# Altium PCB John_Wollam_V2.0.PcbDoc (part 1 of 2)
Units mil, origin at the board's own origin, x right, y up, seen from the top; angles counter-clockwise.
Board outline 3783 x 2360 mil, 2 copper layers (Top Layer, Bottom Layer); 68 components, 42 nets, 236 pads, 62 vias.
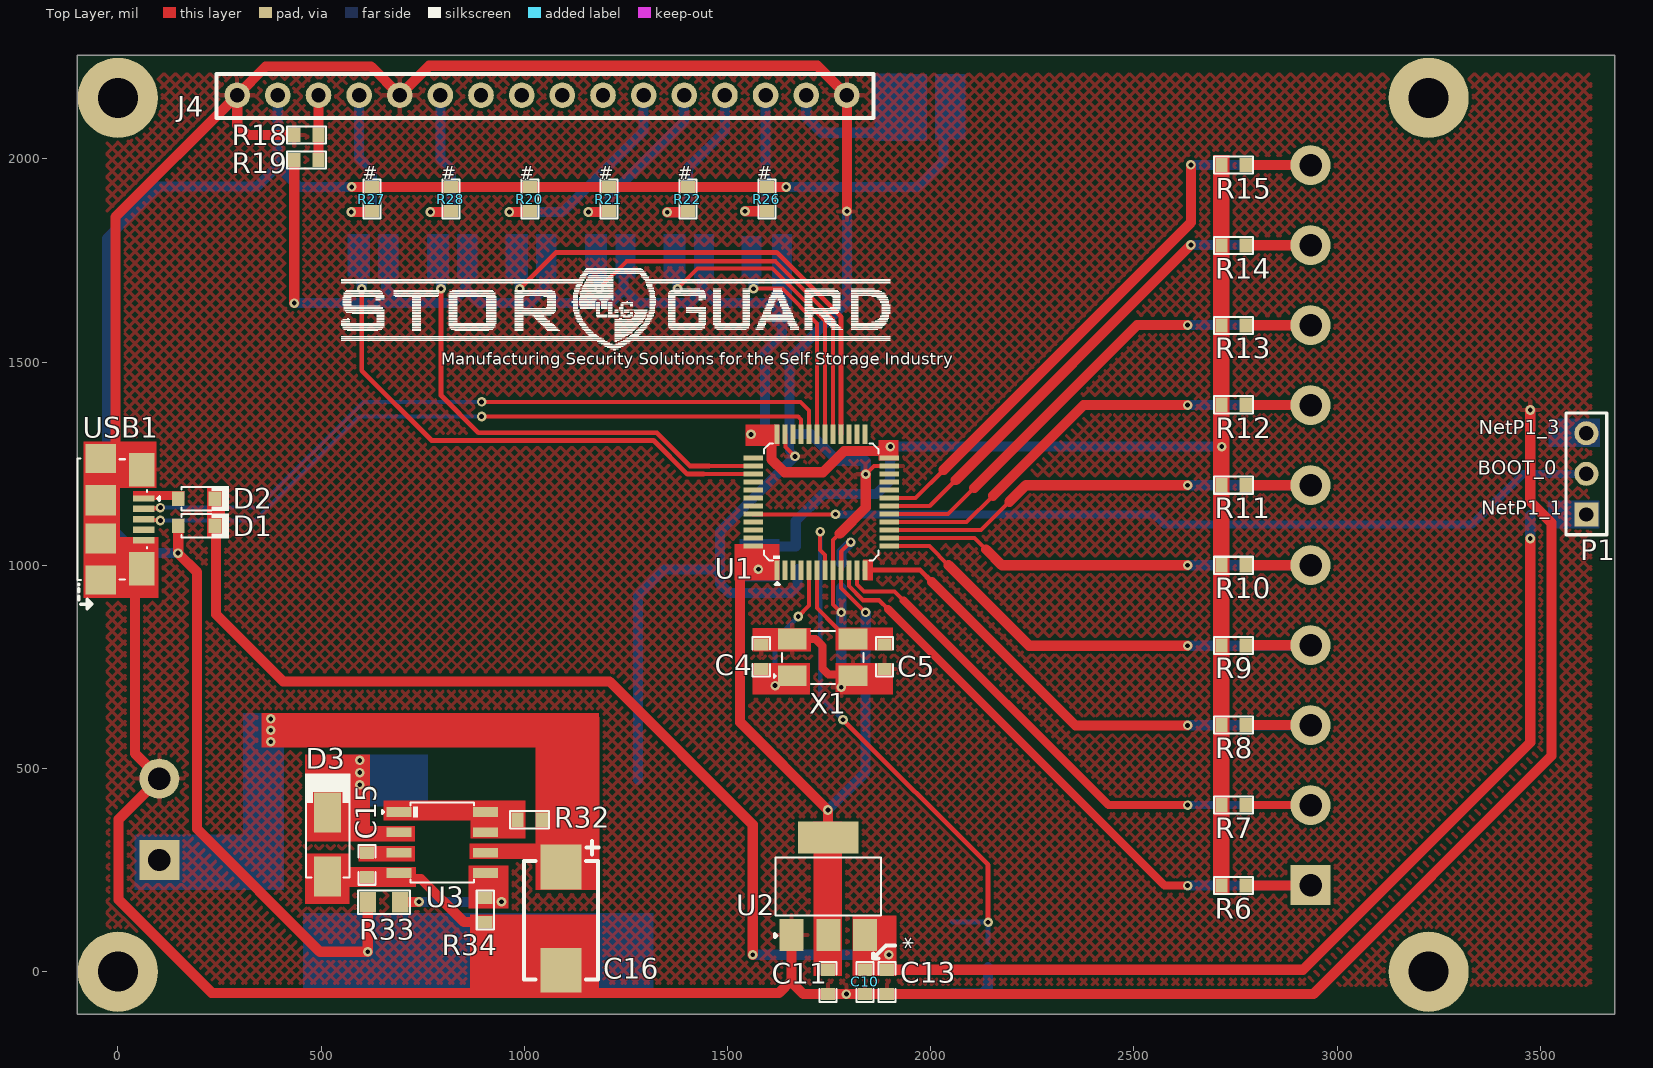
[diagram p0: Top Layer view]
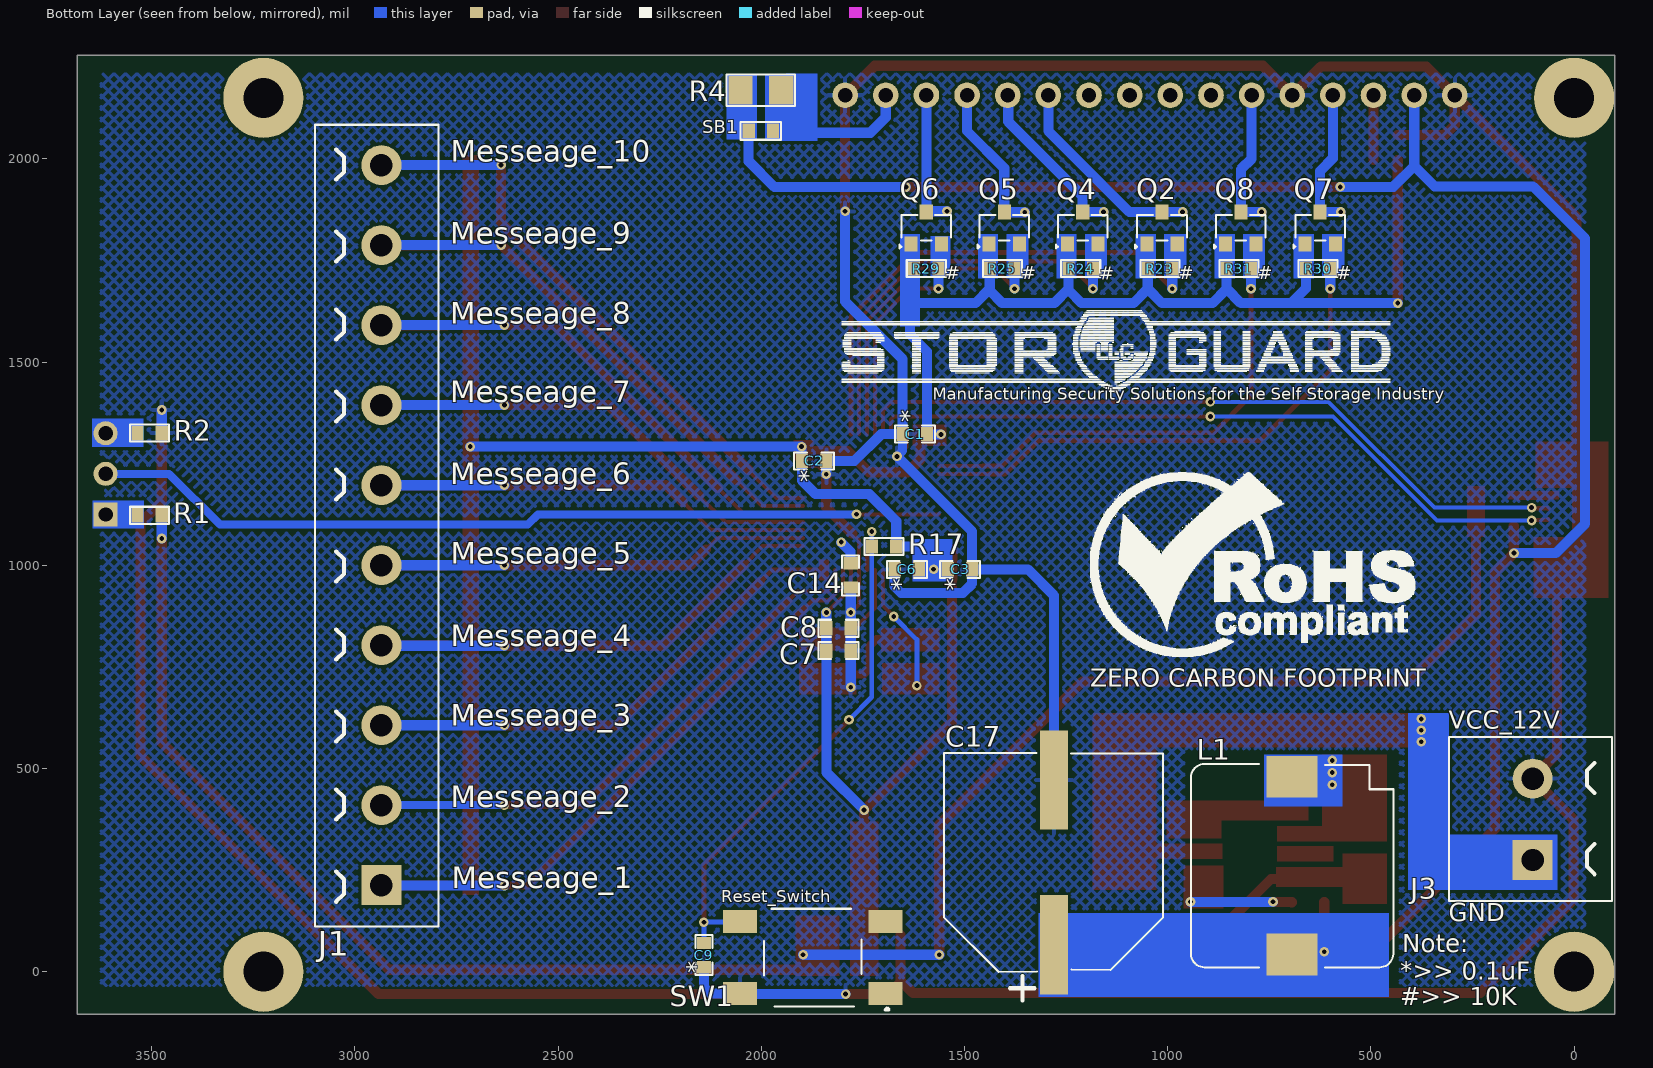
[diagram p1: Bottom Layer view, seen from below]
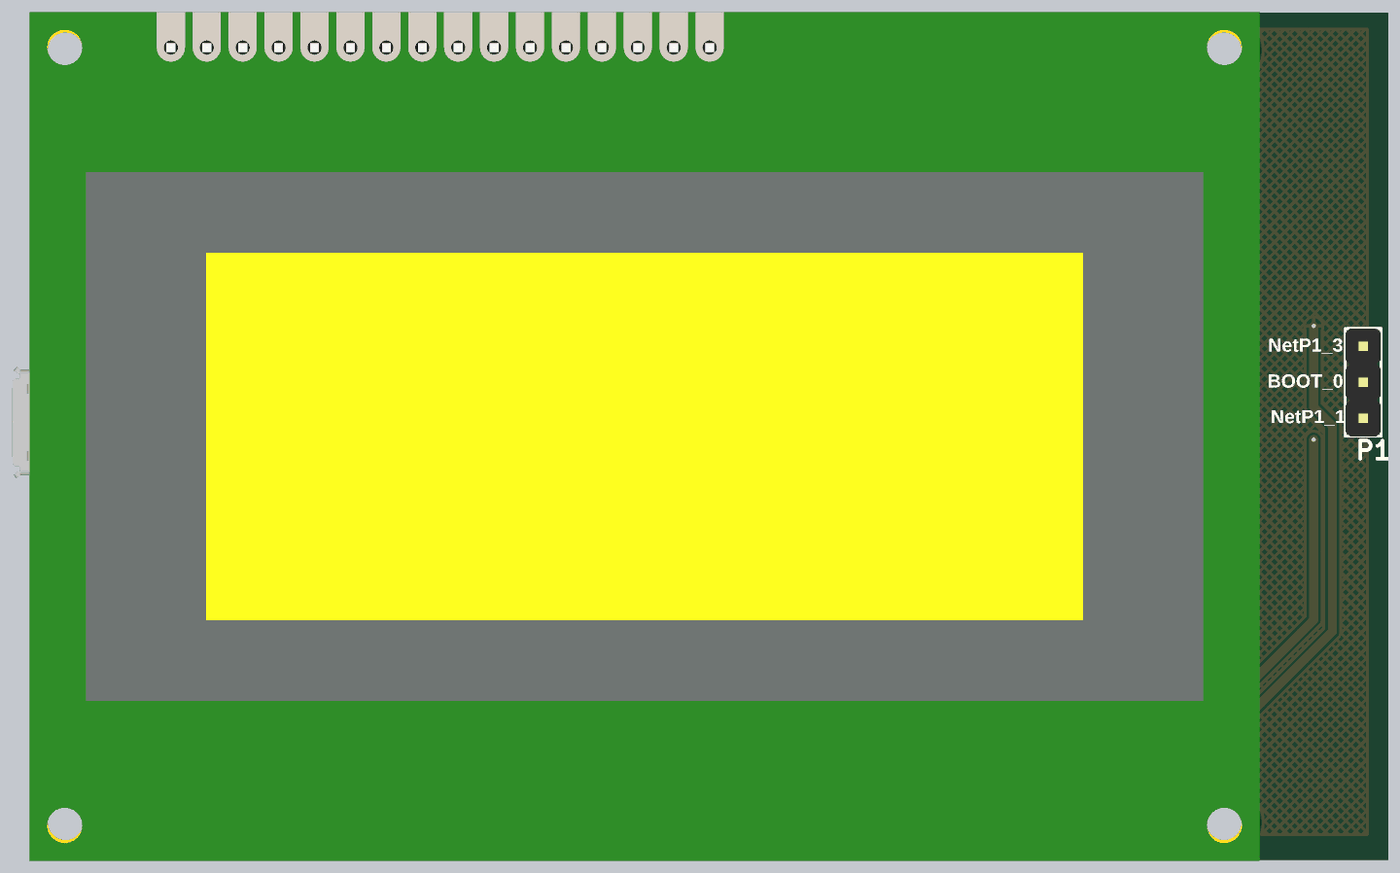
[diagram p2: 3D render of the assembled board from above, using the file's embedded part models]
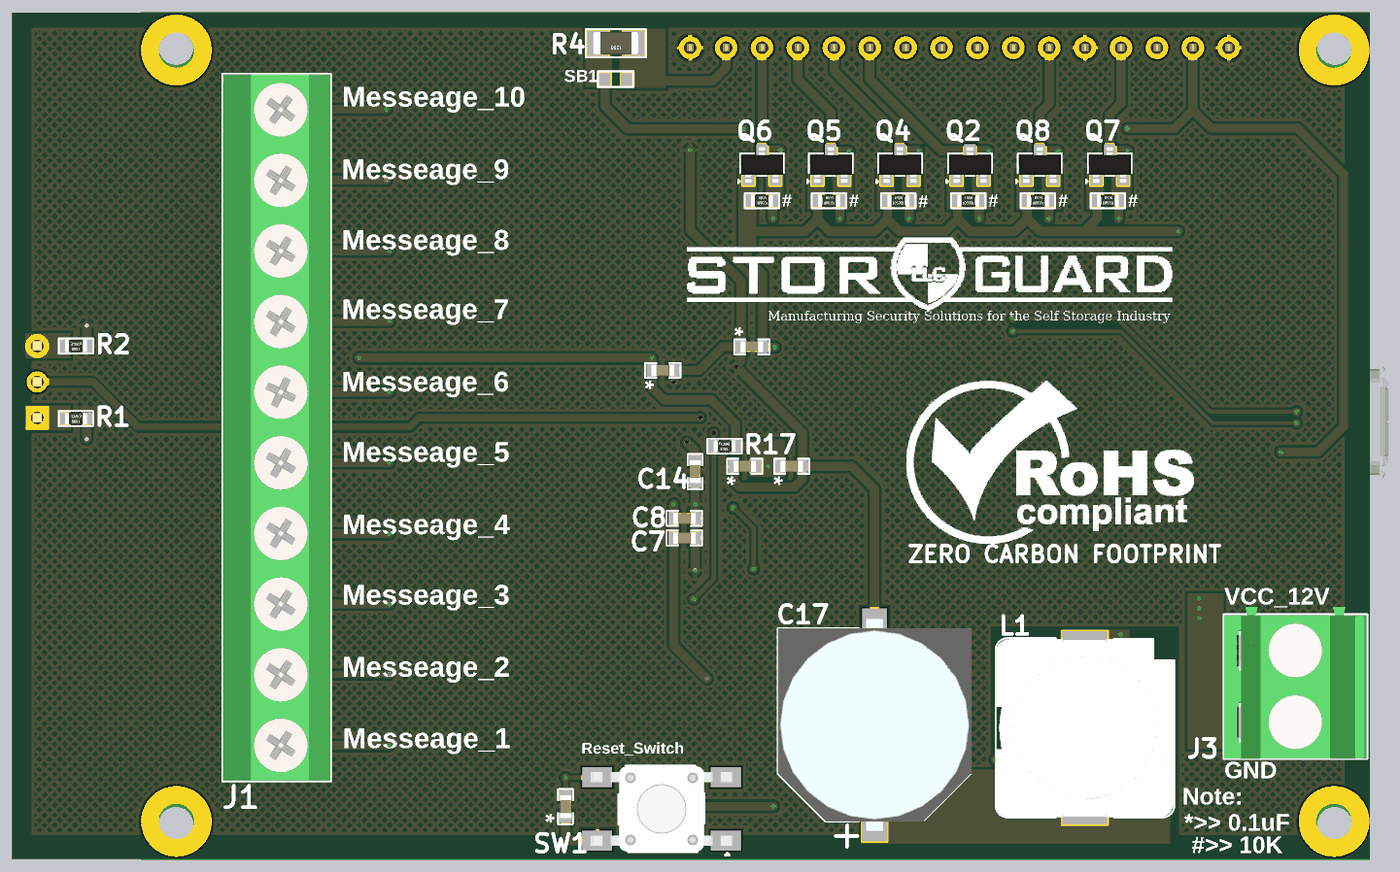
[diagram p3: 3D render of the assembled board from below, using the file's embedded part models]

## Layer stack, top to bottom
Top Solder: solder mask 0.4, Solder Resist, Dk 3.5
Top Layer: signal copper 1.4
Dielectric 1: dielectric 12.6, FR-4, Dk 4.8
Bottom Layer: signal copper 1.4
Bottom Solder: solder mask 0.4, Solder Resist, Dk 3.5

## Board outline
-100,-105 -100,738.49 -100,1049.51 -100,2255 3683,2255 3683,-105

## Design rules (kind name [scope] priority, off if disabled: settings)
Clearance [All] p1: gap=7 ignorepadtopadclearanceinfootprint=FALSE except(5: Arc-SMDPad Track-SMDPad SMDPad-SMDPad)
ComponentClearance [All] p1: gap=0 collisioncheckmode=3 verticalgap=0 showdistances=FALSE
HoleToHoleClearance [All] p1: gap=0 allowstackedmicrovias=TRUE
MinimumSolderMaskSliver [All] p1: minsoldermaskwidth=0
PolygonConnect [All] p1: connectstyle=Relief reliefconductorwidth=10 reliefentries=4 polygonreliefangle="90 Angle" airgapwidth=10
RoutingVias [All] p1: holewidth=11.81 width=23.62 viastyle="Through Hole" minholewidth=11.81 minwidth=23.62 maxholewidth=31.5 maxwidth=62.99
SilkToSilkClearance [All] p1: silktosilkclearance=0
SilkToSolderMaskClearance [IsPad] p1: minsilkscreentomaskgap=0 clearancetoexposedcopper=TRUE
SolderMaskExpansion [All] p1: expansion=4 istentingtop=FALSE
Width [All] p1: maxlimit=50 minlimit=8 preferedwidth=15 minimp=50.000000 maximp=50.000000 favimp=50.000000
25 further rules are at their usual default settings.

## Classes and differential pairs
component class U_Power_Section: C10 C11 C13 C15 C16 C17 D1 D2 D3 L1 R4 R32 R33 R34 SB1 U2 U3
component class U_Logiclevel_Converter_Section: Q2 Q4 Q5 Q6 Q7 Q8 R20 R21 R22 R23 R24 R25 R26 R27 R28 R29 R30 R31
component class U_Controller_Section: C1 C2 C3 C4 C5 C6 C7 C8 C9 C14 P1 R1 R2 R17 SW1 U1 X1
component class U_Connector_Section: J1 J3 J4 R6 R7 R8 R9 R10 R11 R12 R13 R14 R15 R18 R19 SS USB1

## Components (designator, comment, footprint, x,y, rotation, side; value= is the part's Value field where it differs from the comment)
C1 "0.1uF" Cap-0603 1622.09,1322.79 r0 bottom locked
C2 "0.1uF" Cap-0603 1870,1257 r180 bottom locked
C3 "0.1uF" Cap-0603 1511,990.12 r180 bottom locked
C4 "20pF" Cap-0603 1583,775 r270 top locked
C5 "20pF" Cap-0603 1886,775 r90 top locked
C6 "0.1uF" Cap-0603 1641.77,990.12 r0 bottom locked
C7 "1uF" Cap-0603 1810,790 r180 bottom locked
C8 "10000pF" Cap-0603 1810,845 r180 bottom locked
C9 "0.1uF" Cap-0603 2141,41 r90 bottom locked
C10 "0.1uF" Cap-0603 1838,-25 r270 top locked
C11 "4.7uF" Cap-0603 1747,-25 r270 top locked
C13 "1uF" Cap-0603 1892,-25 r270 top locked
C14 "4.7uF" Cap-0603 1780,975 r270 bottom locked
C15 "470pF" Cap-0603 613,263 r90 top locked
C16 "100uF" Case-E 1090.1,257.64 r270 top locked
C17 "470uF" VT1H471MI135000CE0 1280,269 r90 bottom locked
D1 "1N4148WS-7-F" SOD-323 194,1097 r180 top locked
D2 "1N4148WS-7-F" SOD-323 194,1164 r180 top locked
D3 "SS24A" SMA 516,313 r270 top locked
J1 "JL301-50010U02" JL301-50010U02 2934.5,212.85 r90 bottom locked
J3 "WJ500V-5.08-2P" "TERMINAL BLOCK 2P_" 102,375 r90 bottom locked
J4 "16 Pin Female Header With LCD Step" PPPC161LFBN-RC_ 1043.6,2156.5 r0 top locked
L1 "220uH" SLF12575T-221M1R3-PF 694,261 r270 bottom locked
P1 "61300311121" HDR1X3_ 3613,1125 r90 top locked
Q2 "BSS138LT1G" SOT-23 1014,1830 r180 bottom locked
Q4 "BSS138LT1G" SOT-23 1209,1830 r180 bottom locked
Q5 "BSS138LT1G" SOT-23 1402,1830 r180 bottom locked
Q6 "BSS138LT1G" SOT-23 1594,1830 r180 bottom locked
Q7 "BSS138LT1G" SOT-23 625,1830 r180 bottom locked
Q8 "BSS138LT1G" SOT-23 820,1830 r180 bottom locked
R1 "50K" Res-0603 3505,1123 r180 bottom locked
R2 "50K" Res-0603 3505,1325 r180 bottom locked
R4 "3.6R" Res-1206 2001,2169 r0 bottom locked
R6 "20K" Res-0603 2745,212 r180 top locked
R7 "20K" Res-0603 2745,410 r180 top locked
R8 "20K" Res-0603 2745,607 r180 top locked
R9 "20K" Res-0603 2745,803 r180 top locked
R10 "20K" Res-0603 2745,1000 r180 top locked
R11 "20K" Res-0603 2745,1197 r180 top locked
R12 "20K" Res-0603 2745,1395 r180 top locked
R13 "20K" Res-0603 2745,1590 r180 top locked
R14 "20K" Res-0603 2745,1787 r180 top locked
R15 "20K" Res-0603 2745,1985 r180 top locked
R17 "20K" Res-0603 1698,1046 r180 bottom locked
R18 "1K" Res-0603 464,2059 r0 top locked
R19 "DNP" Res-0603 464,1997 r180 top locked value=56K
R20 "10K" Res-0603 1013.8,1901 r90 top locked
R21 "10K" Res-0603 1208.2,1901 r90 top locked
R22 "10K" Res-0603 1402.6,1901 r90 top locked
R23 "10K" Res-0603 1019,1730 r0 bottom locked
R24 "10K" Res-0603 1214,1730 r0 bottom locked
R25 "10K" Res-0603 1407,1730 r0 bottom locked
R26 "10K" Res-0603 1597,1901 r90 top locked
R27 "10K" Res-0603 625,1901 r90 top locked
R28 "10K" Res-0603 819.4,1901 r90 top locked
R29 "10K" Res-0603 1594,1730 r0 bottom locked
R30 "10K" Res-0603 630,1730 r0 bottom locked
R31 "10K" Res-0603 825,1730 r0 bottom locked
R32 "0.33R" Res-0603 1013,374 r0 top locked value=0.33Ω
R33 "3.75K" RES-0805 655,171 r180 top locked
R34 "1.2K" Res-0603 904,152 r270 top locked value=1.2kΩ
SB1 "Solder Bridge" "Solder Bridge" 2001,2069 r180 bottom locked
SW1 "Tactile Switch" TL3301NF160QG 1873.44,35 r0 bottom locked value=Custom
U1 "STM32F070CBT6TR" "48-LQFP (7x7)_" 1730.35,1155.47 r90 top locked
U2 "LDL1117S33R" "SOT- 223" 1748,210 r0 top locked
U3 "MC34063ADR" SOIC-8 798,318 r0 top locked
USB1 "10118192-0001LF" 10118192-0001LF_ 10.66,1113.24 r90 top locked
X1 "8MHz" 5TJ480000XYLBC_ 1734,773.5 r0 top locked

## Footprints (in the part's own frame and the unit in brackets; to place one, negate y for a bottom-side part, rotate by r counter-clockwise, add the part's x,y. Pads: shape width x height; smd on the part's side, far side on the other; paste and mask are expansions set on the pad)
5TJ480000XYLBC_ [mm]
  rect 1.8x1.3 smd mask+0.07: 1(-1.9,-1.15) 2(1.9,-1.15) 3(1.9,1.15) 4(-1.9,1.15)
  silkscreen extent -3.05,-1.65 2.54,1.65, body extent -2.5,-1.6 2.5,1.6, height 1
"48-LQFP (7x7)_" [mm]
  rect 1.22x0.32 smd: 1(-4.25,2.75) 2(-4.25,2.25) 3(-4.25,1.75) 4(-4.25,1.25) 5(-4.25,0.75) 6(-4.25,0.25) 7(-4.25,-0.25) 8(-4.25,-0.75) 9(-4.25,-1.25) 10(-4.25,-1.75) 11(-4.25,-2.25) 12(-4.25,-2.75) 25(4.25,-2.75) 26(4.25,-2.25) 27(4.25,-1.75) 28(4.25,-1.25) 29(4.25,-0.75) 30(4.25,-0.25) 31(4.25,0.25) 32(4.25,0.75) 33(4.25,1.25) 34(4.25,1.75) 35(4.25,2.25) 36(4.25,2.75)
  rect 0.32x1.22 smd: 13(-2.75,-4.25) 14(-2.25,-4.25) 15(-1.75,-4.25) 16(-1.25,-4.25) 17(-0.75,-4.25) 18(-0.25,-4.25) 19(0.25,-4.25) 20(0.75,-4.25) 21(1.25,-4.25) 22(1.75,-4.25) 23(2.25,-4.25) 24(2.75,-4.25) 37(2.75,4.25) 38(2.25,4.25) 39(1.75,4.25) 40(1.25,4.25) 41(0.75,4.25) 42(0.25,4.25) 43(-0.25,4.25) 44(-0.75,4.25) 45(-1.25,4.25) 46(-1.75,4.25) 47(-2.25,4.25) 48(-2.75,4.25)
  silkscreen extent -5.16,-3.58 3.66,3.58, body extent -4.51,-4.51 4.49,4.49, height 1.43
10118192-0001LF_ [mm] "CONN RCPT USB2.0 MICRO B SMD R/A"
  rect 0.4x1.35 smd: 1(1.3,-1.337) 2(0.65,-1.337) 3(0,-1.337) 4(-0.65,-1.337) 5(-1.3,-1.337)
  rect 2.1x1.6 smd: MP1(3.1,-1.212) MP2(-3.1,-1.212)
  rect 1.8x1.9 smd: MP3(-3.8,1.338) MP6(3.8,1.338)
  rect 1.9x1.9 smd: MP4(-1.2,1.338) MP5(1.2,1.338)
  silkscreen extent -5.61,-2.34 3.8,2.79, body extent -3.95,-1.57 3.96,4.09, height 2.74
Cap-0603 [mil]
  rect 30x35 smd mask+2.36: 1(-30,0) 2(30,0)
  silkscreen extent -49,-21 49,21, body extent -32,-16 31,16, height 34
Case-E [mm]
  rect 2.79x2.57 smd: 1(0,0) 2(6.44,0)
  silkscreen extent -1.63,-2.31 7.03,2.34, body extent -0.27,-2.21 6.92,2.21, height 2.88
HDR1X3_ [mm] "Connector; Header; 3 Position"
  rect 1.5x1.5 hole 0.9: 1(0,0)
  round 1.5 hole 0.9: 2(2.54,0) 3(5.08,0)
  silkscreen extent -1.27,-1.27 6.35,1.27, body extent -1.27,-1.24 6.35,1.25, height 8.54
JL301-50010U02 [mm]
  rect 2.5x2.5 hole 1.397: 1(0,0)
  round 2.5 hole 1.397: 2(5,0) 3(10,0) 4(15,0) 5(20,0) 6(25,0) 7(30,0) 8(35,0) 9(40,0) 10(45,0)
  silkscreen extent -2.57,-3.56 47.52,4.14, body extent -2.52,-3.51 47.48,4.09, height 11.7
PPPC161LFBN-RC_ [mm] "CONN HDR 16POS 0.1 GOLD PCB"
  round 1.6 hole 0.9: 1(-19.05,0) 2(-16.51,0) 3(-13.97,0) 4(-11.43,0) 5(-8.89,0) 6(-6.35,0) 7(-3.81,0) 8(-1.27,0) 9(1.27,0) 10(3.81,0) 11(6.35,0) 12(8.89,0) 13(11.43,0) 14(13.97,0) 15(16.51,0) 16(19.05,0)
  silkscreen extent -20.35,-1.42 20.73,1.32, body extent -29.06,-57.48 57.94,2.52, height 21.8
Res-0603 [mil]
  rect 30x35 smd: 1(-30,0) 2(30,0)
  silkscreen extent -48,-21 48,21, body extent -31,-17 31,17, height 18
RES-0805 [mil] "SMD 0805"
  rect 40x50 smd: 1(-40,0) 2(40,0)
  silkscreen extent -64,-29 64,29, body extent -39,-25 39,24, height 24
Res-1206 [mil]
  rect 60x70 smd: 1(-50,0) 2(50,0)
  silkscreen extent -84,-39 84,39, body extent -63,-31 63,32, height 39
SLF12575T-221M1R3-PF [mm] "0.492\" L x 0.492\" W (12.50mm x 12.50mm)"
  rect 2.6x3.2 smd: 1(-5.55,0) 2(5.55,0)
  silkscreen extent -6.35,-6.32 6.35,6.32, body extent -6.27,-6.33 6.33,6.27, height 7.5
SMA [mm]
  rect 2.5x1.7 smd: 1(-2,0) 2(2,0)
  silkscreen extent -4.45,-1.42 2.06,1.42, body extent -2.6,-1.3 2.6,1.3, height 2.4
SOD-323 [mm]
  rect 0.8x0.9 smd mask+0.055: 1(-1.15,0) 2(1.15,0)
  silkscreen extent -2.01,-0.79 0.94,0.79, body extent -1.3,-0.67 1.3,0.67, height 1.1
SOIC-8 [mm]
  rect 1.55x0.6 smd: 1(-2.7,1.905) 2(-2.7,0.635) 3(-2.7,-0.635) 4(-2.7,-1.905) 5(2.7,-1.905) 6(2.7,-0.635) 7(2.7,0.635) 8(2.7,1.905)
  silkscreen extent -3.76,-2.49 1.99,2.49, body extent -3,-2.45 3,2.45, height 1.7
"Solder Bridge" [mil] "Solder Bridge ON"
  rect 30x35 smd: 1(-30,0) 2(30,0)
  silkscreen extent -50,-22 50,22
SOT-23 [mm] "TRANS NPN 40V 0.6A SOT23"
  rect 0.82x0.92 smd: 1(-0.95,-1) 2(0.95,-1) 3(0,1)
  silkscreen extent -1.68,-1.3 1.55,0.81, body extent -1.5,-1.25 1.5,1.25, height 1.05
"SOT- 223" [mm]
  rect 1.5x2 smd: 1(-2.3,-3.05) 2(0,-3.05) 3(2.3,-3.05)
  rect 3.8x2 smd: 4(0,3.05)
  silkscreen extent -3.35,-3.2 3.3,1.8, body extent -3.25,-3.5 3.25,3.5, height 1.61
"TERMINAL BLOCK 2P_" [mm] "TERMINAL BLOCK 2POS 5.08MM SIDE"
  rect 2.5x2.5 hole 1.4: 1(-2.54,0)
  round 2.5 hole 1.4: 2(2.54,0)
  silkscreen extent -5.1,-4.96 5.14,5.22, body extent -5.08,-4.9 5.68,5.2, height 13.8
TL3301NF160QG [mm]
  rect 2.12x1.42 smd: 1(-4.55,2.25) 2(4.55,2.25) 3(-4.55,-2.25) 4(4.55,-2.25)
  silkscreen extent -4.78,-3.05 3.05,3.28, body extent -5,-3 5,3, height 4.41
VT1H471MI135000CE0 [mm] "470uF ±20% 50V 12.5mm 13.5mm 1000hrs 105? -40?~+105? SMD,12.5x13.5mm Aluminum Electrolytic Capacitors - SMD RoHS"
  rect 6.2x1.75 smd: 1(-5.145,0) 2(5.145,0)
  silkscreen extent -8.62,-6.81 6.83,6.86, body extent -7.5,-6.85 7.5,6.85, height 14

## Part data
C1 C2 C3 C6 C9 C10: library part CC0603ZRY5V9BB104, "CAP CER 0.1UF 50V Y5V 0603", Capacitance=100nF, Case Code (Imperial)=0603, Case Code (Metric)=1608, Dielectric=Y5V, LCSC Part Number=C106221, Manufacturer=Yageo, Max Operating Temperature=85°C, Min Operating Temperature=-30°C, Package Quantity=1, Supplier Part Number 1=311-1343-1-ND, Tolerance=80%, Voltage=50V, Case/Package=0603, ComponentLink1Description=http://www.yageo.com/documents/recent/UPY-GPHC_Y5V_6.3V-to-50V_8.pdf?src-supplier=Digi-Key, ComponentLink1URL=http://www.yageo.com/documents/recent/UPY-GPHC_Y5V_6.3V-to-50V_8.pdf?src-supplier=Digi-Key, ComponentLink2Description=http://www.yageo.com/documents/recent/UPY-GPHC_Y5V_6.3V-to-50V_5.pdf?src-supplier=Avnet+Europe, ComponentLink2URL=http://www.yageo.com/documents/recent/UPY-GPHC_Y5V_6.3V-to-50V_5.pdf?src-supplier=Avnet+Europe, ComponentLink3Description=https://www.verical.com/server-webapp/html/getDatasheet?partID=403611&src-supplier=Verical, ComponentLink3URL=https://www.verical.com/server-webapp/html/getDatasheet?partID=403611&src-supplier=Verical, ComponentLink4Description=http://www.mouser.com/ds/2/447/Yageo_UPY-GP_NP0_16V-to-50V_9-358835.pdf?src-supplier=Mouser, ComponentLink4URL=http://www.mouser.com/ds/2/447/Yageo_UPY-GP_NP0_16V-to-50V_9-358835.pdf?src-supplier=Mouser, ComponentLink5Description=http://www.farnell.com/datasheets/1132289.pdf?src-supplier=Element14, ComponentLink5URL=http://www.farnell.com/datasheets/1132289.pdf?src-supplier=Element14, Composition=Ceramic, Depth=0.8mm, Halogen Free="Halogen Free", Height=0.8mm, Lead Free="Lead Free", Length=1.6mm, Manufacturer Part Number=CC0603ZRY5V9BB104, Mount="Surface Mount", Number of Pins=2, Packaging="Tape and Reel", Pricing 1="1=0.1, 10=0.075, 100=0.0334, 500=0.02386, 1000=0.01874 (USD)", Radiation Hardening=No, REACH SVHC="No SVHC", Stock 1=15000880, Supplier 1=Digi-Key, Termination=SMD/SMT, Thickness=0.035inch, Voltage Rating=50V, Voltage Rating (DC)=50V, Width=0.031inch
C4 C5: library part CC0603JRNPO9BN200, "CAP CER 20PF 50V C0G/NPO 0603", Case Code (Imperial)=0603, Case Code (Metric)=1608, Dielectric=C0G, LCSC Part Number=C105621, Manufacturer=Yageo, Max Operating Temperature=125°C, Min Operating Temperature=-55°C, Package Quantity=4000, Supplier Part Number 1=311-1424-6-ND, Tolerance=5%, Voltage Rating=50V, Capacitance=20pF, Case/Package=0603, ComponentLink1Description=http://www.farnell.com/datasheets/1132289.pdf?src-supplier=Element14, ComponentLink1URL=http://www.farnell.com/datasheets/1132289.pdf?src-supplier=Element14, ComponentLink2Description=http://www.yageo.com/documents/recent/UPY-GP_NP0_16V-to-50V_16.pdf?src-supplier=Digi-Key, ComponentLink2URL=http://www.yageo.com/documents/recent/UPY-GP_NP0_16V-to-50V_16.pdf?src-supplier=Digi-Key, Composition=Ceramic, Depth=0.8mm, Lead Free="Lead Free", Length=1.6mm, Manufacturer Part Number=CC0603JRNPO9BN200, Mount="Surface Mount", Number of Pins=2, Packaging="Tape and Reel", Pricing 1="1=0.1, 10=0.048, 100=0.0214, 500=0.01526, 1000=0.01198 (USD)", REACH SVHC=Unknown, Stock 1=259568, Supplier 1=Digi-Key, Termination=SMD/SMT, Thickness=0.035inch, Voltage Rating (DC)=50V, Weight=7.1E-05oz, Width=0.8mm
C7 C13: library part UMK107AB7105KA-T, "CAP CER 1UF 50V X7R 0603", Case Code (Imperial)=0603, Case Code (Metric)=1608, Dielectric=X7R, LCSC Part Number=C105174, Manufacturer="Taiyo Yuden", Max Operating Temperature=125°C, Min Operating Temperature=-55°C, Package Quantity=1, Supplier Part Number 1=587-3247-1-ND, Tolerance=10%, Voltage Rating=50V, Capacitance=1uF, Case/Package=0603, ComponentLink1Description=http://www.farnell.com/datasheets/2048165.pdf?src-supplier=Element14, ComponentLink1URL=http://www.farnell.com/datasheets/2048165.pdf?src-supplier=Element14, ComponentLink2Description=https://www.murata.com/~/media/webrenewal/support/library/catalog/products/capacitor/mlcc/c02e.ashx?la=en-us&src-supplier=Digi-Key, ComponentLink2URL=https://www.murata.com/~/media/webrenewal/support/library/catalog/products/capacitor/mlcc/c02e.ashx?la=en-us&src-supplier=Digi-Key, ComponentLink3Description=https://www.yuden.co.jp/productdata/catalog/mlcc_all_e.pdf?src-supplier=Digi-Key, ComponentLink3URL=https://www.yuden.co.jp/productdata/catalog/mlcc_all_e.pdf?src-supplier=Digi-Key, ComponentLink4Description=https://www.yuden.co.jp/productdata/catalog/mlcc_all_e.pdf?src-supplier=Onlinecomponents.com, ComponentLink4URL=https://www.yuden.co.jp/productdata/catalog/mlcc_all_e.pdf?src-supplier=Onlinecomponents.com, Depth=0.8mm, Halogen Free="Halogen Free", Height=0.8mm, Length=1.6mm, Manufacturer Part Number=UMK107AB7105KA-T, Mount="Surface Mount", Packaging="Tape and Reel", Pricing 1="1=0.28, 10=0.19, 100=0.1079, 500=0.0762, 1000=0.0667 (USD)", Radiation Hardening=No, Stock 1=453098, Supplier 1=Digi-Key, Termination=SMD/SMT, Thickness=0.037inch, Voltage Rating (DC)=50V, Width=0.031inch
C8: library part CC0603KRX7R9BB103, "CAP CER 10000PF 50V X7R 0603", Capacitance=10nF, Case Code (Imperial)=0603, Case Code (Metric)=1608, Dielectric=X7R, Insulation Resistance=100GR, LCSC Part Number=C100042, Manufacturer=Yageo, Max Operating Temperature=125°C, Min Operating Temperature=-55°C, Package Quantity=1, Supplier Part Number 1=311-1085-6-ND, Tolerance=10%, Voltage=50V, Case/Package=0603, ComponentLink1Description=http://www.farnell.com/datasheets/1734573.pdf?src-supplier=Element14, ComponentLink1URL=http://www.farnell.com/datasheets/1734573.pdf?src-supplier=Element14, ComponentLink2Description=http://www.yageo.com/documents/recent/UPY-GPHC_X7R_6.3V-to-50V_18.pdf?src-supplier=Digi-Key, ComponentLink2URL=http://www.yageo.com/documents/recent/UPY-GPHC_X7R_6.3V-to-50V_18.pdf?src-supplier=Digi-Key, ComponentLink3Description=http://www.farnell.com/datasheets/2167236.pdf?src-supplier=Mouser, ComponentLink3URL=http://www.farnell.com/datasheets/2167236.pdf?src-supplier=Mouser, ComponentLink4Description=http://www.farnell.com/datasheets/70765.pdf?src-supplier=Element14, ComponentLink4URL=http://www.farnell.com/datasheets/70765.pdf?src-supplier=Element14, ComponentLink5Description=http://www.yageo.com/documents/recent/UPY-GPHC_X7R_6.3V-to-50V_8.pdf?src-supplier=Avnet+Europe, ComponentLink5URL=http://www.yageo.com/documents/recent/UPY-GPHC_X7R_6.3V-to-50V_8.pdf?src-supplier=Avnet+Europe, ComponentLink6Description=http://www.farnell.com/datasheets/1489800.pdf?src-supplier=Element14, ComponentLink6URL=http://www.farnell.com/datasheets/1489800.pdf?src-supplier=Element14, ComponentLink7Description=https://www.verical.com/server-webapp/html/getDatasheet?partID=403582&src-supplier=Verical, ComponentLink7URL=https://www.verical.com/server-webapp/html/getDatasheet?partID=403582&src-supplier=Verical, Composition=Ceramic, Depth=0.8mm, Halogen Free="Halogen Free", Height=0.8mm, Lead Free="Lead Free", Length=1.6mm, Manufacturer Part Number=CC0603KRX7R9BB103, Material=Ceramic, Mount="Surface Mount", Number of Pins=2, Packaging="Tape and Reel", Pricing 1="1=0.1, 10=0.038, 100=0.0171, 500=0.01224, 1000=0.00962 (USD)", Radiation Hardening=No, REACH SVHC="No SVHC", Stock 1=8411467, Supplier 1=Digi-Key, Termination=SMD/SMT, Thickness=0.035inch, Voltage Rating=50V, Voltage Rating (DC)=50V, Width=0.031inch
C11 C14: library part GRM188R61E475KE11D, "CAP CER 4.7UF 25V X5R 0603", Case Code (Imperial)=0603, Case Code (Metric)=1608, Dielectric=X5R, LCSC Part Number=C90057, Manufacturer=Murata, Max Operating Temperature=85°C, Min Operating Temperature=-55°C, Package Quantity=4000, Supplier Part Number 1=490-7203-1-ND, Tolerance=10%, Voltage=25V, Capacitance=4.7uF, Case/Package=0603, ComponentLink1Description=http://www.farnell.com/datasheets/2048165.pdf?src-supplier=Element14, ComponentLink1URL=http://www.farnell.com/datasheets/2048165.pdf?src-supplier=Element14, ComponentLink2Description=https://www.murata.com/~/media/webrenewal/support/library/catalog/products/capacitor/mlcc/c02e.ashx?la=en-us&src-supplier=Digi-Key, ComponentLink2URL=https://www.murata.com/~/media/webrenewal/support/library/catalog/products/capacitor/mlcc/c02e.ashx?la=en-us&src-supplier=Digi-Key, Depth=0.8mm, Height=0.8mm, Lead Free="Lead Free", Length=1.6mm, Manufacturer Part Number=GRM188R61E475KE11D, Material=Ceramic, Mount="Surface Mount", Packaging="Cut Tape", Pricing 1="1=0.37, 10=0.258, 100=0.1549, 500=0.1162, 1000=0.09812 (USD)", REACH SVHC="No SVHC", Stock 1=71618, Supplier 1=Digi-Key, Thickness=0.031inch, Voltage Rating=25V, Voltage Rating (DC)=25V, Width=0.031inch
C15: library part CC0603KRX7R9BB471, "CAP CER 470pF 10% X7R 50V 0603 SMD", Case Code (Imperial)=0603, Case Code (Metric)=1608, Dielectric=X7R, Dielectric Material=Ceramic, Insulation Resistance=10GR, LCSC Part Number=C107092, Manufacturer=Yageo, Max Operating Temperature=125°C, Min Operating Temperature=-55°C, Package Quantity=1, Supplier Part Number 1=311-1078-1-ND, Tolerance=10%, Voltage Rating=50V, Capacitance=470pF, Case/Package=0603, Category="Ceramic Capacitors", ComponentLink1Description=https://datasheet.ciiva.com/5425/upy-gphc-x7r-6-3v-to-50v-8-12304-5425461.pdf?src-supplier=Mouser, ComponentLink1URL=https://datasheet.ciiva.com/5425/upy-gphc-x7r-6-3v-to-50v-8-12304-5425461.pdf?src-supplier=Mouser, ComponentLink2Description=https://datasheet.ciiva.com/144/mlccorderingcode-144439.pdf?src-supplier=Digi-Key, ComponentLink2URL=https://datasheet.ciiva.com/144/mlccorderingcode-144439.pdf?src-supplier=Digi-Key, ComponentLink3Description=https://datasheet.ciiva.com/144/mlccorderingcode-144440.pdf?src-supplier=Digi-Key, ComponentLink3URL=https://datasheet.ciiva.com/144/mlccorderingcode-144440.pdf?src-supplier=Digi-Key, ComponentLink4Description=https://datasheet.ciiva.com/11587/upy-gphc-x7r-6-3v-to-50v-8-11587224.pdf?src-supplier=Avnet, ComponentLink4URL=https://datasheet.ciiva.com/11587/upy-gphc-x7r-6-3v-to-50v-8-11587224.pdf?src-supplier=Avnet, ComponentLink5Description=https://datasheet.ciiva.com/144/mlccorderingcode-144441.pdf?src-supplier=Digi-Key, ComponentLink5URL=https://datasheet.ciiva.com/144/mlccorderingcode-144441.pdf?src-supplier=Digi-Key, ComponentLink6Description=https://datasheet.ciiva.com/16623/upy-gphc-x7r-6-3v-to-50v-8-16623897.pdf?src-supplier=Avnet+Europe, ComponentLink6URL=https://datasheet.ciiva.com/16623/upy-gphc-x7r-6-3v-to-50v-8-16623897.pdf?src-supplier=Avnet+Europe, ComponentLink7Description=https://datasheet.ciiva.com/8033/1489800-8033898.pdf?src-supplier=Element14, ComponentLink7URL=https://datasheet.ciiva.com/8033/1489800-8033898.pdf?src-supplier=Element14, ComponentLink8Description=https://datasheet.ciiva.com/8033/1489800-8033899.pdf?src-supplier=Element14, ComponentLink8URL=https://datasheet.ciiva.com/8033/1489800-8033899.pdf?src-supplier=Element14, ComponentLink9Description=https://datasheet.ciiva.com/26829/getdatasheetpartid-251791-26829452.pdf?src-supplier=Verical, ComponentLink9URL=https://datasheet.ciiva.com/26829/getdatasheetpartid-251791-26829452.pdf?src-supplier=Verical, ComponentLink10Description=https://datasheet.ciiva.com/28450/1489800-28450652.pdf?src-supplier=Element14, ComponentLink10URL=https://datasheet.ciiva.com/28450/1489800-28450652.pdf?src-supplier=Element14, ComponentLink11Description=https://datasheet.ciiva.com/8033/70765-8033902.pdf?src-supplier=Element14, ComponentLink11URL=https://datasheet.ciiva.com/8033/70765-8033902.pdf?src-supplier=Element14, Depth=0.8mm, Dissipation Factor=2.5%, Halogen Free="Halogen Free", Height=0.8mm, Lead Free="Lead Free", Length=1.6mm, Manufacturer Part Number=CC0603KRX7R9BB471, Mount="Surface Mount", Number of Pins=2, Packaging="Tape and Reel", Pricing 1="1=0.10000, 10=0.04500, 50=0.02460, 100=0.02010, 500=0.01432, 1000=0.01125 (USD)", Radiation Hardening=No, REACH SVHC="No SVHC", Resistor Type=Ceramic, RoHS=Yes, RoHS Compliant=Yes, Series=CC, Stock 1=2173, Supplier 1=Digi-Key, Termination=SMD/SMT, Thickness=0.035inch, Voltage Rating (DC)=50V, Width=0.8mm
C16: library part TAJE107M025RNJ, "CAP TANT 100UF 20% 25V 2917", Case Code (Imperial)=2917, Case Code (Metric)=7343, ESR (Equivalent Series Resistance)=300mR, LCSC Part Number=C7230, Leakage Current=25uA, Manufacturer="Kyocera AVX", Max Operating Temperature=125°C, Min Operating Temperature=-55°C, Package Quantity=1, Supplier Part Number 1=581-TAJE107M025RNJ, Tolerance=20%, Voltage Rating=25V, Capacitance=100uF, Case/Package=2917, Category="Tantalum Capacitors", ComponentLink1Description=https://datasheet.ciiva.com/26787/taje107m025rnj-26787048.pdf?src-supplier=IIIC, ComponentLink1URL=https://datasheet.ciiva.com/26787/taje107m025rnj-26787048.pdf?src-supplier=IIIC, ComponentLink2Description=https://datasheet.ciiva.com/265/taj-265541.pdf?src-supplier=Digi-Key, ComponentLink2URL=https://datasheet.ciiva.com/265/taj-265541.pdf?src-supplier=Digi-Key, ComponentLink3Description=https://datasheet.ciiva.com/265/taj-265542.pdf?src-supplier=Digi-Key, ComponentLink3URL=https://datasheet.ciiva.com/265/taj-265542.pdf?src-supplier=Digi-Key, ComponentLink4Description=https://datasheet.ciiva.com/265/taj-265540.pdf?src-supplier=Digi-Key, ComponentLink4URL=https://datasheet.ciiva.com/265/taj-265540.pdf?src-supplier=Digi-Key, ComponentLink5Description=https://datasheet.ciiva.com/28609/1719052-28609254.pdf?src-supplier=Element14, ComponentLink5URL=https://datasheet.ciiva.com/28609/1719052-28609254.pdf?src-supplier=Element14, ComponentLink6Description=https://datasheet.ciiva.com/11230/taj-11230456.pdf?src-supplier=Avnet, ComponentLink6URL=https://datasheet.ciiva.com/11230/taj-11230456.pdf?src-supplier=Avnet, ComponentLink7Description=https://datasheet.ciiva.com/17339/taj-17339677.pdf?src-supplier=Avnet+Europe, ComponentLink7URL=https://datasheet.ciiva.com/17339/taj-17339677.pdf?src-supplier=Avnet+Europe, ComponentLink8Description=https://datasheet.ciiva.com/22667/1719052-22667581.pdf?src-supplier=Element14, ComponentLink8URL=https://datasheet.ciiva.com/22667/1719052-22667581.pdf?src-supplier=Element14, Construction=Flat, Depth=4.3mm, Dissipation Factor=10%, Features="General Purpose", Height=4.3mm, Height - Seated (Max)=0.169inch, Lead Free="Lead Free", Length=7.3mm, Manufacturer Part Number=TAJE107M025RNJ, Mount="Surface Mount", Number of Pins=2, Packaging="Tape and Reel", Polarity=Polar, Pricing 1="1=2.81000, 10=2.81000, 50=2.81000, 100=2.19000, 1000=1.76000, 10000=1.76000 (USD)", Radiation Hardening=No, REACH SVHC="No SVHC", RoHS=Yes, RoHS Compliant=Yes, Series=TAJ, Stock 1=109, Supplier 1=Mouser, Termination=SMD/SMT, Voltage Rating (DC)=25V, Width=4.3mm
C17: library part VT1H471MI135000CE0, "470uF ±20% 50V 12.5mm 13.5mm 1000hrs 105℃ -40℃~+105℃ SMD,12.5x13.5mm Aluminum Electrolytic Capacitors - SMD RoHS", LCSC Part Number=C191227, Lifetime @ Temp="1000hrs 105℃", Manufacturer="Changzhou Huawei Elec", Operating Temperature=-40℃~+105℃, Package=SMD,12.5x13.5mm, Rated Voltage=50V, Tolerance=±20%, Capacitance=470uF, L=13.5mm, φD=12.5mm
D1 D2: "DIODE GEN PURP 75V 150MA SOD323", Average Rectified Current=150mA, Capacitance=2pF, Forward Current=300mA, Forward Voltage=1.25V, LCSC Part Number=C60580, Manufacturer=Diodes, Max Forward Surge Current (Ifsm)=2A, Max Operating Temperature=150°C, Max Repetitive Reverse Voltage (Vrrm)=75V, Max Reverse Current=1uA, Min Operating Temperature=-65°C, Package Quantity=3000, Power Dissipation=200mW, Supplier Part Number 1=621-1N4148WS-F, Category="Rectifier Diodes", ComponentLink1Description=https://datasheet.ciiva.com/1179/ds30097-1179355.pdf?src-supplier=Element14, ComponentLink1URL=https://datasheet.ciiva.com/1179/ds30097-1179355.pdf?src-supplier=Element14, ComponentLink2Description=https://datasheet.ciiva.com/8300/ds30097-8300396.pdf?src-supplier=Avnet, ComponentLink2URL=https://datasheet.ciiva.com/8300/ds30097-8300396.pdf?src-supplier=Avnet, ComponentLink3Description=https://datasheet.ciiva.com/16199/ds30097-16199061.pdf?src-supplier=Future+Electronics, ComponentLink3URL=https://datasheet.ciiva.com/16199/ds30097-16199061.pdf?src-supplier=Future+Electronics, ComponentLink4Description=https://datasheet.ciiva.com/911/ds30097-911742.pdf?src-supplier=Digi-Key, ComponentLink4URL=https://datasheet.ciiva.com/911/ds30097-911742.pdf?src-supplier=Digi-Key, ComponentLink5Description=https://datasheet.ciiva.com/911/ds30097-911743.pdf?src-supplier=Digi-Key, ComponentLink5URL=https://datasheet.ciiva.com/911/ds30097-911743.pdf?src-supplier=Digi-Key, ComponentLink6Description=https://datasheet.ciiva.com/911/ds30097-911741.pdf?src-supplier=Digi-Key, ComponentLink6URL=https://datasheet.ciiva.com/911/ds30097-911741.pdf?src-supplier=Digi-Key, Contact Plating=Tin,Matte, Current Rating=150mA, Element Configuration=Single, Height=1mm, Lead Free="Lead Free", Length=1.8mm, Manufacturer Part Number=1N4148WS-7-F, Max Reverse Voltage (DC)=75V, Max Surge Current=2A, Mount="Surface Mount", Number of Pins=2, Output Current=150mA, Packaging="Tape and Reel", Peak Non-Repetitive Surge Current=2A, Polarity=Standard, Power Rating=200mW, Pricing 1="1=0.19000, 10=0.17500, 50=0.17500, 100=0.09600, 500=0.05900, 1000=0.04000, 3000=0.03000, 9000=0.02600, 10000=0.02600, 24000=0.02300, 45000=0.01900 (USD)", Radiation Hardening=No, REACH SVHC="No SVHC", Recovery Time=4ns, Reverse Recovery Time=4ns, Reverse Recovery Time-Max=4ns, RoHS=Yes, RoHS Compliant=Yes, Series=-, Supplier 1=Mouser, Voltage=75V, Voltage Rating (DC)=75V, Weight=0.000173oz, Width=1.4mm
D3: "40V 500mV@2A 2A SMA(DO-214AC) Schottky Barrier Diodes (SBD) ROHS", LCSC Part Number=C2886579, Manufacturer="Guangdong Hottech", Package=SMA(DO-214AC), ComponentLink1Description=LCSC, ComponentLink1URL=https://www.lcsc.com/product-detail/Schottky-Barrier-Diodes-SBD_Guangdong-Hottech-SS24A_C2886579.html, Manufacturer Part Number=SS24A
J1: library part "Terminal Block 10 Position (5MM)", "15A 300V Blue Straight pin 5mm 10 Straight,P=5mm Screw terminal", LCSC Part Number=C409141, Manufacturer=JILN, ComponentLink1Description=LCSC, ComponentLink1URL=https://www.lcsc.com/product-detail/span-style-background-color-ff0-Screw-span-span-style-background-color-ff0-terminal-span_JILN-JL301-50010U02_C409141.html, Manufacturer Part Number=JL301-50010U02
J3: library part "Terminal Block 2POS", "2.5 18A Green Straight pin 5.08mm 1 14~30 2 Straight,P=5.08mm", LCSC Part Number=C8465, Manufacturer="Ningbo Kangnex Elec", ComponentLink1Description=LCSC, ComponentLink1URL=https://www.lcsc.com/product-detail/Screw-span-style-background-color-ff0-terminal-span_Ningbo-Kangnex-Elec-WJ500V-5-08-2P_C8465.html, Manufacturer Part Number=WJ500V-5.08-2P
J4: library part PPPC161LFBN-RC, "CONN HDR 16POS 0.1 GOLD PCB", Color=Black, LCSC Part Number=C3322257, Manufacturer=Sullins, Package Quantity=1000, Supplier Part Number 1=S7049-ND, ComponentLink1Description=LCSC, ComponentLink1URL=https://www.lcsc.com/product-detail/Female-Headers_Sullins-Connector-Solutions-PPPC161LFBN-RC_C3322257.html, Connector Type=Header,Socket, Contact Material=Bronze, Contact Plating=Gold, Height=8.5mm, Housing Material=Plastic, Lead Free="Lead Free", Length=41.1mm, Manufacturer Part Number=PPPC161LFBN-RC, Mount="Through Hole", Number of Positions=16, Number of Rows=1, Packaging=Bulk, Pitch=0.1inch, Pricing 1="1=1.02, 10=0.897, 100=0.7742, 500=0.63342, 1000=0.56304, 5000=0.5083 (USD)", Stock 1=6865, Supplier 1=Digi-Key, Termination=Solder, Width=2.5mm
L1: library part SLF12575T-221M1R3-PF, "Inductor Power Shielded Wirewound 220uH 20% 1KHz Ferrite 1.3A 310mOhm DCR Blister T/R", Case/Package=Nonstandard, Current Rating=1.3A, DC Resistance (DCR)=310mR, LCSC Part Number=C93225, Manufacturer=TDK, Max Operating Temperature=105°C, Min Operating Temperature=-20°C, Package Quantity=500, Resistor Type=Wirewound, Supplier Part Number 1=445-174412-1-ND, Test Frequency=1kHz, Tolerance=20%, Category="Fixed Inductors", ComponentLink1Description=https://datasheet.ciiva.com/11802/0900766b812b7d4f-11802208.pdf?src-supplier=RSComponents, ComponentLink1URL=https://datasheet.ciiva.com/11802/0900766b812b7d4f-11802208.pdf?src-supplier=RSComponents, Core Material=Ferrite, DC Current=1.3A, Depth=12.8mm, Height=0.295inch, Height - Seated (Max)=0.309inch, Inductance=220uH, Lead Free="Lead Free", Length=12.5mm, Manufacturer Part Number=SLF12575T-221M1R3-PF, Max DC Current=1.3A, Military Standard=Not, Mount="Surface Mount", Packaging="Tape and Reel", Pricing 1="1=1.97000, 10=1.81500, 25=1.66360, 50=1.42180, 100=1.27050, 250=1.08900 (USD)", RoHS=Yes, RoHS Compliant=Yes, Saturation Current=1.3A, Series=SLF, Shielding=Shielded, Stock 1=1079, Supplier 1=Digi-Key, Termination=SMD/SMT, Width=12.5mm
P1: "CONN HEADER VERT 3POS 2.54MM", Color=Black, Manufacturer="Wurth Electronics", Supplier Part Number 1=732-5316-ND, ComponentLink1Description=http://www.farnell.com/cad/1737268.pdf?src-supplier=Element14, ComponentLink1URL=http://www.farnell.com/cad/1737268.pdf?src-supplier=Element14, ComponentLink2Description=https://katalog.we-online.de/em/datasheet/6130xx11121.pdf?src-supplier=Digi-Key, ComponentLink2URL=https://katalog.we-online.de/em/datasheet/6130xx11121.pdf?src-supplier=Digi-Key, Connector Type="Male Pin", Contact Material=Copper, Contact Mating Length=0.236inch, Contact Plating=Gold, Gender=Male, Lead Free="Lead Free", Manufacturer Part Number=61300311121, Mount="Through Hole", Number of Contacts=3, Number of Positions=3, Number of Rows=1, Packaging=Bulk, Pitch=0.1inch, Pricing 1="1=0.13, 10=0.106, 25=0.088, 50=0.074, 100=0.067, 1000=0.061 (USD)", REACH SVHC=Unknown, Stock 1=81286, Supplier 1=Digi-Key, Termination=Solder
Q2 Q4 Q5 Q6 Q7 Q8: "MOSFET N-CH 50V 200MA SOT-23", Case/Package=SOT-23-3, Continuous Drain Current (ID)=200mA, Drain to Source Breakdown Voltage=50V, Drain to Source Resistance=3.5R, Gate to Source Voltage (Vgs)=20V, Input Capacitance=50pF, LCSC Part Number=C82045, Manufacturer="ON Semiconductor", Max Operating Temperature=150°C, Max Power Dissipation=225mW, Min Operating Temperature=-55°C, Package Quantity=1, Supplier Part Number 1=BSS138LT1GOSDKR-ND, Threshold Voltage=1.5V, ComponentLink1Description=https://datasheet.ciiva.com/22641/1596366-22641636.pdf, ComponentLink1URL=https://datasheet.ciiva.com/22641/1596366-22641636.pdf, ComponentLink2Description=https://datasheet.ciiva.com/1190/1596366-1190137.pdf, ComponentLink2URL=https://datasheet.ciiva.com/1190/1596366-1190137.pdf, ComponentLink3Description=https://datasheet.ciiva.com/15198/getdatasheetpartid-110266-15198908.pdf, ComponentLink3URL=https://datasheet.ciiva.com/15198/getdatasheetpartid-110266-15198908.pdf, ComponentLink4Description=https://datasheet.ciiva.com/8115/bss138lt1-d-8115295.pdf, ComponentLink4URL=https://datasheet.ciiva.com/8115/bss138lt1-d-8115295.pdf, ComponentLink5Description=https://datasheet.ciiva.com/8115/bss138lt1-d-8115358.pdf, ComponentLink5URL=https://datasheet.ciiva.com/8115/bss138lt1-d-8115358.pdf, ComponentLink6Description=https://datasheet.ciiva.com/1190/1596366-1190136.pdf, ComponentLink6URL=https://datasheet.ciiva.com/1190/1596366-1190136.pdf, ComponentLink7Description=https://datasheet.ciiva.com/936/bss138lt1-d-936802.pdf, ComponentLink7URL=https://datasheet.ciiva.com/936/bss138lt1-d-936802.pdf, ComponentLink8Description=https://datasheet.ciiva.com/936/bss138lt1-d-936801.pdf, ComponentLink8URL=https://datasheet.ciiva.com/936/bss138lt1-d-936801.pdf, ComponentLink9Description=https://datasheet.ciiva.com/14553/70099493-14553829.pdf, ComponentLink9URL=https://datasheet.ciiva.com/14553/70099493-14553829.pdf, ComponentLink10Description=https://datasheet.ciiva.com/936/bss138lt1-d-936803.pdf, ComponentLink10URL=https://datasheet.ciiva.com/936/bss138lt1-d-936803.pdf, ComponentLink11Description=http://www.onsemi.com/pub/Collateral/BSS138LT1-D.PDF?src-supplier=Digi-Key, ComponentLink11URL=http://www.onsemi.com/pub/Collateral/BSS138LT1-D.PDF?src-supplier=Digi-Key, ComponentLink12Description=http://www.farnell.com/datasheets/1596366.pdf?src-supplier=Element14, ComponentLink12URL=http://www.farnell.com/datasheets/1596366.pdf?src-supplier=Element14, ComponentLink13Description=http://www.alliedelec.com/m/d/b3c6fd7d92596813fe75d33dcbaaae90.pdf?src-supplier=Allied+Electronics, ComponentLink13URL=http://www.alliedelec.com/m/d/b3c6fd7d92596813fe75d33dcbaaae90.pdf?src-supplier=Allied+Electronics, ComponentLink14Description=https://www.verical.com/server-webapp/html/getDatasheet?partID=110266&src-supplier=Verical, ComponentLink14URL=https://www.verical.com/server-webapp/html/getDatasheet?partID=110266&src-supplier=Verical, ComponentLink15Description=http://www.onsemi.com/pub_link/Collateral/BSS138LT1-D.PDF?src-supplier=Avnet, ComponentLink15URL=http://www.onsemi.com/pub_link/Collateral/BSS138LT1-D.PDF?src-supplier=Avnet, Contact Plating=Tin,Matte, Current Rating=200mA, Element Configuration=Single, Halogen Free="Halogen Free", Height=1.01mm, Lead Free="Lead Free", Length=3.04mm, Manufacturer Part Number=BSS138LT1G, Nominal Vgs=1.5V, Number of Elements=1, Number of Pins=3, On-State Resistance=3.5R, Packaging="Tape and Reel", Power Dissipation=225mW, Pricing 1="1=0.27, 10=0.222, 100=0.1177, 500=0.07746, 1000=0.05267 (USD)", Radiation Hardening=No, Rds On Max=3.5R, REACH SVHC="No SVHC", Stock 1=1283212, Supplier 1=Digi-Key, Turn-Off Delay Time=20ns, Turn-On Delay Time=20ns, Voltage Rating (DC)=50V, Width=1.4mm
R1 R2: library part PNM0603E5002BST5, "RES SMD 50K OHM 0.1% 0.15W 0603", Case Code (Imperial)=0603, Case Code (Metric)=1608, LCSC Part Number=C2073717, Manufacturer="Vishay Dale Thin Film", Max Operating Temperature=125°C, Min Operating Temperature=-55°C, Power Rating=150mW, Resistance=50kR, Supplier Part Number 1=PNM0603-50KBDKR-ND, Temperature Coefficient=25ppm/°C, Tolerance=0.1%, Voltage Rating=75V, Case/Package=0603, ComponentLink1Description=LCSC, ComponentLink1URL=https://www.lcsc.com/product-detail/Chip-Resistor-Surface-Mount_Vishay-Intertech-PNM0603E5002BST5_C2073717.html, Composition="Thin Film", Contact Plating=Copper,Tin,Silver, Height=0.02inch, Length=0.064inch, Manufacturer Part Number=PNM0603E5002BST5, Packaging="Tape and Reel", Pricing 1="1=3.07, 10=2.743, 100=2.0299 (USD)", Radiation Hardening=No, REACH SVHC=Unknown, Stock 1=16518, Supplier 1=Digi-Key, Termination=SMD/SMT, Voltage Rating (DC)=75V, Width=0.032inch
R4: library part CRCW12063R60FKEA, "RES SMD 3.6 OHM 1% 1/4W 1206", Case Code (Imperial)=1206, Case Code (Metric)=3216, LCSC Part Number=C2080361, Manufacturer="Vishay Dale", Max Operating Temperature=155°C, Max Power Dissipation=250mW, Min Operating Temperature=-55°C, Package Quantity=10, Supplier Part Number 1=541-3.60FFCT-ND, Temperature Coefficient=100ppm/°C, Tolerance=1%, Case/Package=1206, ComponentLink1Description=http://www.vishay.com/docs/20035/dcrcwe3.pdf?src-supplier=Digi-Key, ComponentLink1URL=http://www.vishay.com/docs/20035/dcrcwe3.pdf?src-supplier=Digi-Key, Composition="Thick Film", Contact Plating=Tin, Depth=1.6mm, Features="Automotive AEC-Q200", Height=0.024inch, Lead Free="Lead Free", Length=0.126inch, Manufacturer Part Number=CRCW12063R60FKEA, Military Standard=Not, Number of Terminations=2, Packaging="Tape and Reel", Pricing 1="1=0.1, 10=0.083, 100=0.0319, 1000=0.01404, 2500=0.01213 (USD)", Radiation Hardening=No, Resistance=3.6R, Stock 1=16877, Supplier 1=Digi-Key, Width=0.063inch
R6 R7 R8 R9 R10 R11 R12 R13 R14 R15 R17: library part RC0603FR-0720KL, "RES 20K OHM 1% 1/10W 0603", Case Code (Imperial)=0603, Case Code (Metric)=1608, LCSC Part Number=C105575, Manufacturer=Yageo, Max Operating Temperature=155°C, Max Power Dissipation=100mW, Min Operating Temperature=-55°C, Package Quantity=1, Resistance=20kR, Resistance Tolerance=1%, Resistor Type="Thick Film", Temperature Coefficient=100ppm/°C, Voltage Rating=50V, Case/Package=0603, Category="Chip SMD Resistors", ComponentLink1Description=https://datasheet.ciiva.com/11808/0900766b80f96399-11808275.pdf?src-supplier=RSComponents, ComponentLink1URL=https://datasheet.ciiva.com/11808/0900766b80f96399-11808275.pdf?src-supplier=RSComponents, ComponentLink2Description=https://datasheet.ciiva.com/22747/443971-22747525.pdf?src-supplier=Element14, ComponentLink2URL=https://datasheet.ciiva.com/22747/443971-22747525.pdf?src-supplier=Element14, ComponentLink3Description=https://datasheet.ciiva.com/2453/pyu-r-int-thick-7-2453911.pdf?src-supplier=Digi-Key, ComponentLink3URL=https://datasheet.ciiva.com/2453/pyu-r-int-thick-7-2453911.pdf?src-supplier=Digi-Key, ComponentLink4Description=https://datasheet.ciiva.com/2453/pyu-r-int-thick-7-2453912.pdf?src-supplier=Digi-Key, ComponentLink4URL=https://datasheet.ciiva.com/2453/pyu-r-int-thick-7-2453912.pdf?src-supplier=Digi-Key, ComponentLink5Description=https://datasheet.ciiva.com/2453/pyu-r-int-thick-7-2453910.pdf?src-supplier=Digi-Key, ComponentLink5URL=https://datasheet.ciiva.com/2453/pyu-r-int-thick-7-2453910.pdf?src-supplier=Digi-Key, Construction=Rectangular, Depth=0.8mm, Features="Moisture Resistant", Height=0.022inch, Lead Free="Lead Free", Length=0.063inch, Manufacturer Part Number=RC0603FR-0720KL, Military Standard=Not, Number of Pins=2, Number of Terminations=2, Packaging="Tape and Reel", Power Rating=100mW, Pricing 1="5000=0.00240, 10000=0.00220, 25000=0.00200, 50000=0.00190, 125000=0.00180 (USD)", REACH SVHC="No SVHC", RoHS=Yes, RoHS Compliant=Yes, Series=RC, Size Code=0603, Stock 1=945000, Supplier 1="Arrow Electronics", Supplier Part Number 1=RC0603FR-0720KL, Technology="THICK FILM", Termination=SMD/SMT, Tolerance=1%, Voltage Rating (DC)=50V, Width=0.031inch
R18: library part RC0603FR-071KL, "RES SMD 1K OHM 1% 1/10W 0603", Case Code (Imperial)=0603, Case Code (Metric)=1608, LCSC Part Number=C22548, Manufacturer=Yageo, Max Operating Temperature=155°C, Min Operating Temperature=-55°C, Power Rating=100mW, Resistance=1kR, Supplier Part Number 1=311-1.00KHRDKR-ND, Temperature Coefficient=100ppm/°C, Tolerance=1%, Voltage Rating=50V, Case/Package=0603, ComponentLink1Description=https://www.verical.com/server-webapp/html/getDatasheet?partID=409289&src-supplier=Verical, ComponentLink1URL=https://www.verical.com/server-webapp/html/getDatasheet?partID=409289&src-supplier=Verical, ComponentLink2Description=http://documents.rs-components.com/techlib://itc_doclist_GB.htm?stockno=5048928&src-supplier=RSComponents, ComponentLink2URL=http://documents.rs-components.com/techlib://itc_doclist_GB.htm?stockno=5048928&src-supplier=RSComponents, ComponentLink3Description=http://www.yageo.com/documents/recent/PYu-RC0603_51_RoHS_L_4.pdf?src-supplier=Avnet+Europe, ComponentLink3URL=http://www.yageo.com/documents/recent/PYu-RC0603_51_RoHS_L_4.pdf?src-supplier=Avnet+Europe, ComponentLink4Description=http://www.farnell.com/datasheets/2167052.pdf?src-supplier=Element14, ComponentLink4URL=http://www.farnell.com/datasheets/2167052.pdf?src-supplier=Element14, ComponentLink5Description=http://www.farnell.com/datasheets/1868787.pdf?src-supplier=Element14, ComponentLink5URL=http://www.farnell.com/datasheets/1868787.pdf?src-supplier=Element14, ComponentLink6Description=http://www.yageo.com/documents/recent/PYu-RC_Group_51_RoHS_L_2.pdf?src-supplier=Avnet, ComponentLink6URL=http://www.yageo.com/documents/recent/PYu-RC_Group_51_RoHS_L_2.pdf?src-supplier=Avnet, ComponentLink7Description=https://www.verical.com/server-webapp/html/getDatasheet?partID=404327&src-supplier=Verical, ComponentLink7URL=https://www.verical.com/server-webapp/html/getDatasheet?partID=404327&src-supplier=Verical, ComponentLink8Description=http://www.farnell.com/datasheets/443971.pdf?src-supplier=Element14, ComponentLink8URL=http://www.farnell.com/datasheets/443971.pdf?src-supplier=Element14, Composition="Thick Film", Contact Plating=Tin,Matte, Depth=0.8mm, Height=0.45mm, Lead Free="Lead Free", Length=1.6mm, Manufacturer Part Number=RC0603FR-071KL, Military Standard=Not, Packaging="Tape and Reel", Pricing 1="1=0.1, 10=0.023, 100=0.0094, 1000=0.0042, 2500=0.0037 (USD)", Radiation Hardening=No, REACH SVHC="No SVHC", Stock 1=21472395, Supplier 1=Digi-Key, Termination=SMD/SMT
R19: library part RC0603FR-0756KL, "RES 56K OHM 1% 1/10W 0603", Case Code (Imperial)=0603, Case Code (Metric)=1608, LCSC Part Number=C114630, Manufacturer=Yageo, Max Operating Temperature=155°C, Max Power Dissipation=100mW, Min Operating Temperature=-55°C, Package Quantity=1, Resistance=56kR, Resistance Tolerance=1%, Resistor Type="Thick Film", Supplier Part Number 1=1995607, Temperature Coefficient=100ppm/°C, Voltage Rating=75V, Voltage Rating (DC)=50V, Case/Package=0603, Category="Chip SMD Resistors", ComponentLink1Description=https://datasheet.ciiva.com/2508/pyu-r-int-thick-7-2508519.pdf?src-supplier=Digi-Key, ComponentLink1URL=https://datasheet.ciiva.com/2508/pyu-r-int-thick-7-2508519.pdf?src-supplier=Digi-Key, ComponentLink2Description=https://datasheet.ciiva.com/2508/pyu-r-int-thick-7-2508520.pdf?src-supplier=Digi-Key, ComponentLink2URL=https://datasheet.ciiva.com/2508/pyu-r-int-thick-7-2508520.pdf?src-supplier=Digi-Key, ComponentLink3Description=https://datasheet.ciiva.com/2508/pyu-r-int-thick-7-2508518.pdf?src-supplier=Digi-Key, ComponentLink3URL=https://datasheet.ciiva.com/2508/pyu-r-int-thick-7-2508518.pdf?src-supplier=Digi-Key, ComponentLink4Description=https://datasheet.ciiva.com/7746/443971-7746377.pdf?src-supplier=Element14, ComponentLink4URL=https://datasheet.ciiva.com/7746/443971-7746377.pdf?src-supplier=Element14, ComponentLink5Description=https://datasheet.ciiva.com/7746/443971-7746376.pdf?src-supplier=Element14, ComponentLink5URL=https://datasheet.ciiva.com/7746/443971-7746376.pdf?src-supplier=Element14, ComponentLink6Description=https://datasheet.ciiva.com/15189/getdatasheetpartid-329310-15189781.pdf?src-supplier=Verical, ComponentLink6URL=https://datasheet.ciiva.com/15189/getdatasheetpartid-329310-15189781.pdf?src-supplier=Verical, Construction=Rectangular, Depth=0.8mm, Features="Moisture Resistant", Height=0.022inch, Lead Free="Lead Free", Length=1.6mm, Manufacturer Part Number=RC0603FR-0756KL, Military Standard=Not, Number of Pins=2, Number of Terminations=2, Package=0603, Packaging="Tape and Reel", Power Rating=100mW, Pricing 1="100=0.01300, 500=0.01200, 1000=0.01100, 2500=0.01000, 5000=0.00900 (GBP)", Reach SVHC Compliant=Unknown, RoHS=Yes, RoHS Compliant=Yes, Series=RC, Size Code=0603, Stock 1=15000, Supplier 1=RSComponents, Termination=SMD/SMT, Tolerance=1%, Weight=7.1E-05oz, Width=0.8mm
R20 R21 R22 R23 R24 R25 R26 R27 R28 R29 R30 R31: library part RC0603FR-0710KL, "RES SMD 10K Ohm 1% 1/10W 0603", Case Code (Imperial)=0603, Case Code (Metric)=1608, LCSC Part Number=C98220, Manufacturer=Yageo, Max Operating Temperature=155°C, Max Power Dissipation=100mW, Min Operating Temperature=-55°C, Resistance=10kR, Resistance Tolerance=1%, Resistor Type="Thick Film", Supplier Part Number 1=311-10.0KHRCT-ND, Temperature Coefficient=100ppm/°C, Voltage Rating=75V, Voltage Rating (DC)=50V, Case/Package=0603, Category="Chip SMD Resistors", ComponentLink1Description=https://datasheet.ciiva.com/7660/38590-7660789.pdf?src-supplier=Element14, ComponentLink1URL=https://datasheet.ciiva.com/7660/38590-7660789.pdf?src-supplier=Element14, ComponentLink2Description=https://datasheet.ciiva.com/7983/443971-7983596.pdf?src-supplier=Element14, ComponentLink2URL=https://datasheet.ciiva.com/7983/443971-7983596.pdf?src-supplier=Element14, ComponentLink3Description=https://datasheet.ciiva.com/22747/443971-22747519.pdf?src-supplier=Element14, ComponentLink3URL=https://datasheet.ciiva.com/22747/443971-22747519.pdf?src-supplier=Element14, ComponentLink4Description=https://datasheet.ciiva.com/46440/1868787-46440891.pdf?src-supplier=Element14, ComponentLink4URL=https://datasheet.ciiva.com/46440/1868787-46440891.pdf?src-supplier=Element14, ComponentLink5Description=https://datasheet.ciiva.com/7746/1738695-7746239.pdf?src-supplier=Element14, ComponentLink5URL=https://datasheet.ciiva.com/7746/1738695-7746239.pdf?src-supplier=Element14, ComponentLink6Description=https://datasheet.ciiva.com/15189/getdatasheetpartid-409289-15189591.pdf?src-supplier=Verical, ComponentLink6URL=https://datasheet.ciiva.com/15189/getdatasheetpartid-409289-15189591.pdf?src-supplier=Verical, Construction=Rectangular, Depth=0.8mm, Features="Moisture Resistant", Height=0.45mm, Lead Free="Lead Free", Lead Pitch=0.3mm, Length=1.6mm, Manufacturer Part Number=RC0603FR-0710KL, Military Standard=Not, Number of Pins=2, Number of Terminations=2, Packaging="Tape and Reel", Power Rating=100mW, Pricing 1="1=0.10000, 10=0.02400, 100=0.00970, 1000=0.00436, 2500=0.00378 (USD)", REACH SVHC=Unknown, RoHS=Yes, RoHS Compliant=Yes, Series=RC, Size Code=0603, Stock 1=25249139, Supplier 1=Digi-Key, Termination=SMD/SMT, Tolerance=1%, Weight=7.1E-05oz, Width=0.8mm
R32: library part RTT03R330FTP, "±1% 1/10W Thick Film Resistors 75V ±600ppm/℃ -55℃~+155℃ 0.33Ω 0603 Chip Resistor - Surface Mount ROHS", LCSC Part Number=C103893, Manufacturer=RALEC, ComponentLink1Description=LCSC, ComponentLink1URL=https://lcsc.com/product-detail/Chip-Resistor-Surface-Mount_RALEC-RTT03R330FTP_C103893.html, Manufacturer Part Number=RTT03R330FTP
R33: library part AR05BTB3751A010, "100mW Thin Film Resistor 100V 3.75kΩ 0805 Chip Resistor", LCSC Part Number=C374641, Manufacturer="Viking Tech", Package=0805, ComponentLink1Description=LCSC, ComponentLink1URL=https://www.lcsc.com/product-detail/Chip-Resistor-Surface-Mount_Viking-Tech-AR05BTB3751A010_C374641.html, Manufacturer Part Number=AR05BTB3751A010
R34: library part 0603WAF1201T5E, "±1% 1/10W Thick Film Resistors 75V ±100ppm/℃ -55℃~+155℃ 1.2kΩ 0603 Chip Resistor - Surface Mount ROHS", LCSC Part Number=C22765, Manufacturer=UNI-ROYAL, ComponentLink1Description=LCSC, ComponentLink1URL=https://lcsc.com/product-detail/Chip-Resistor-Surface-Mount_UNI-ROYAL-Uniroyal-Elec-0603WAF1201T5E_C22765.html, Footpint=0603, Manufacturer Part Number=0603WAF1201T5E
SB1: "Solder Bridge ON"
SW1: library part TL3301NF160QG, "SWITCH TACTILE SPST-NO 0.05A 12V", LCSC Part Number=C273526, Manufacturer=E-Switch, Manufacturer Part Number=TL3301NF160QG/TR, Package="SMD (6.00mm x 6.00mm)", ComponentLink1Description=LCSC, ComponentLink1URL=https://www.lcsc.com/product-detail/Tactile-Switches_E-Switch-TL3301NF160QG_C273526.html